# Altium PCB pcb test.PcbDoc
Units mm, origin at the board's own origin, x right, y up, seen from the top; angles counter-clockwise.
Board outline 81.91 x 97.41 mm, 2 copper layers (Top Layer, Bottom Layer); 35 components, 31 nets, 85 pads, 0 vias.
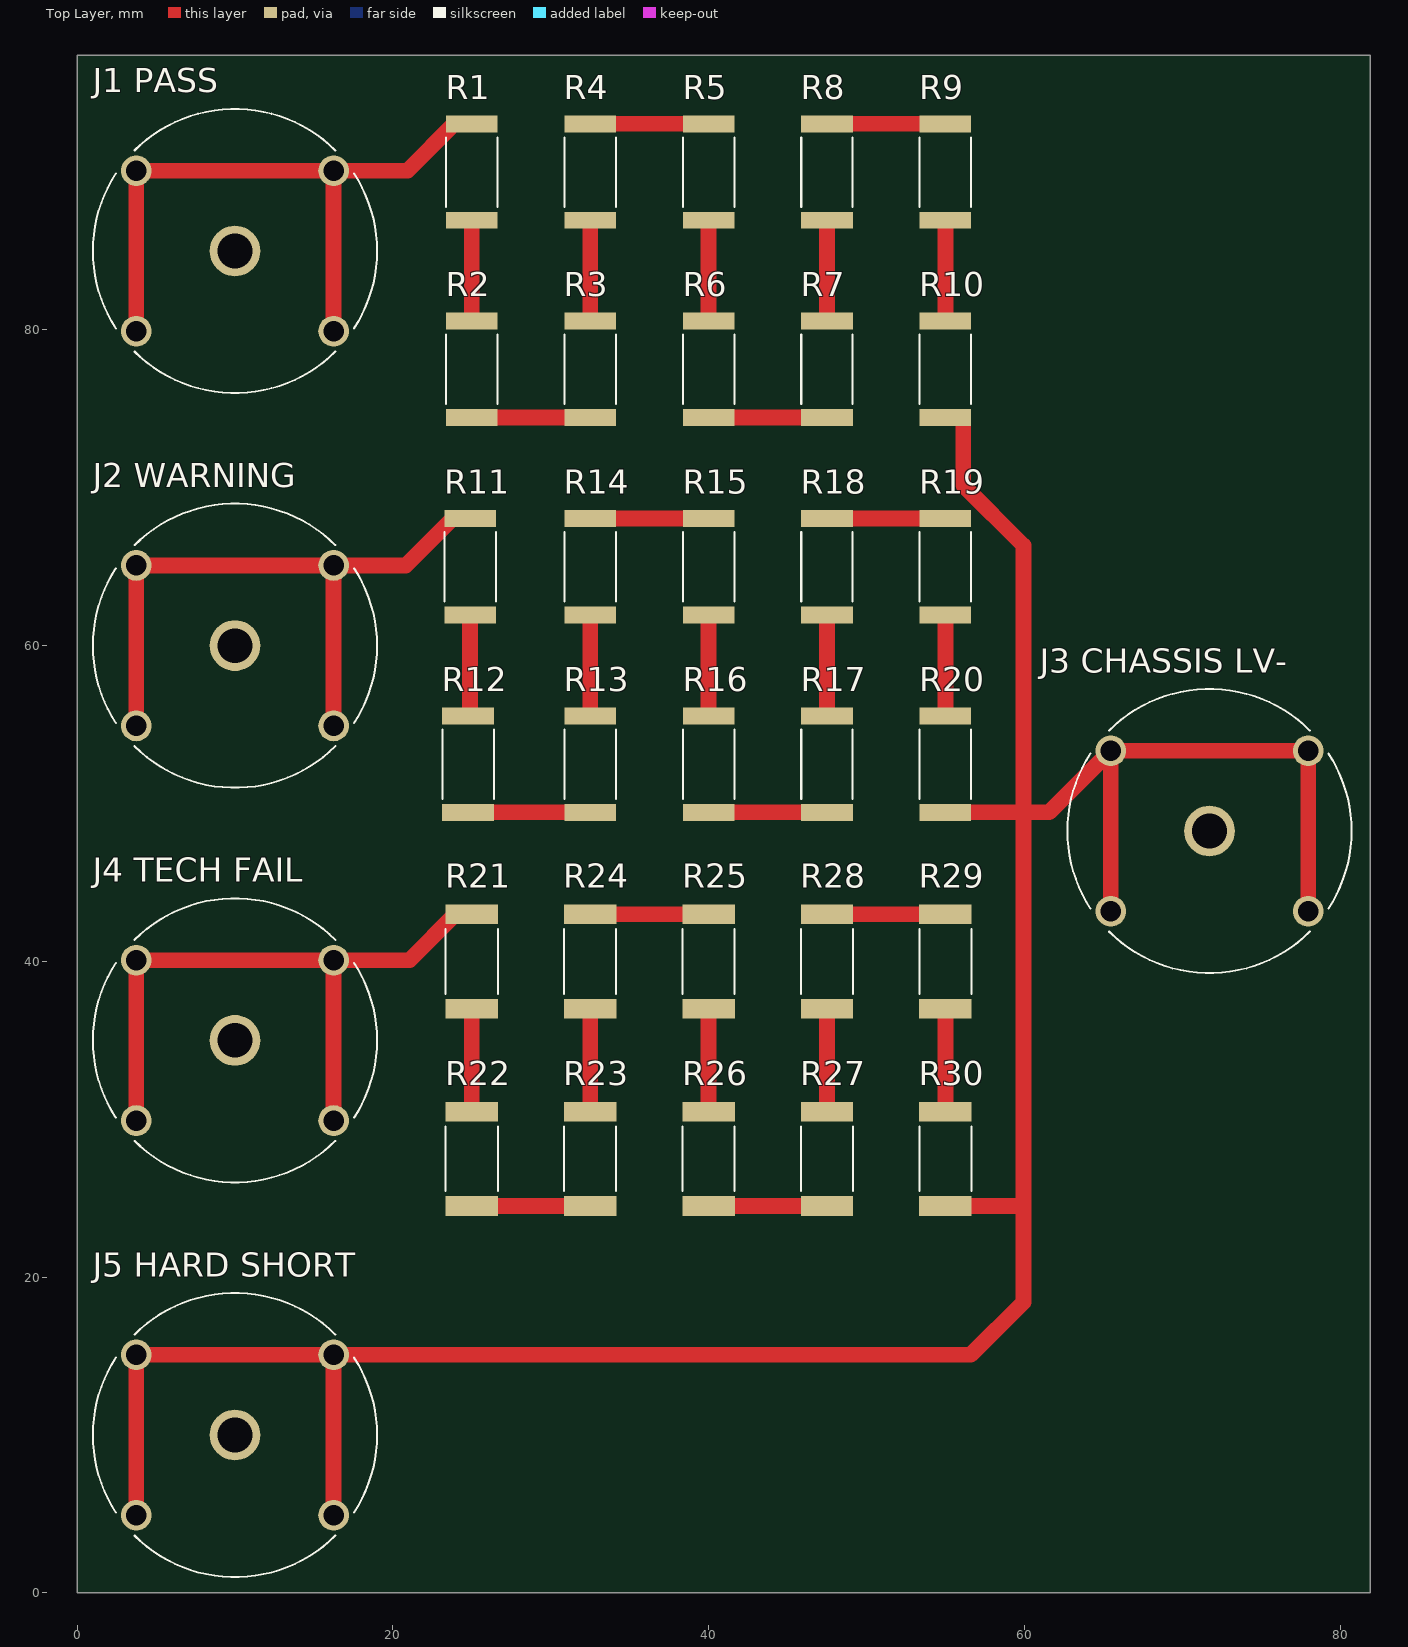
[diagram p0: Top Layer view]
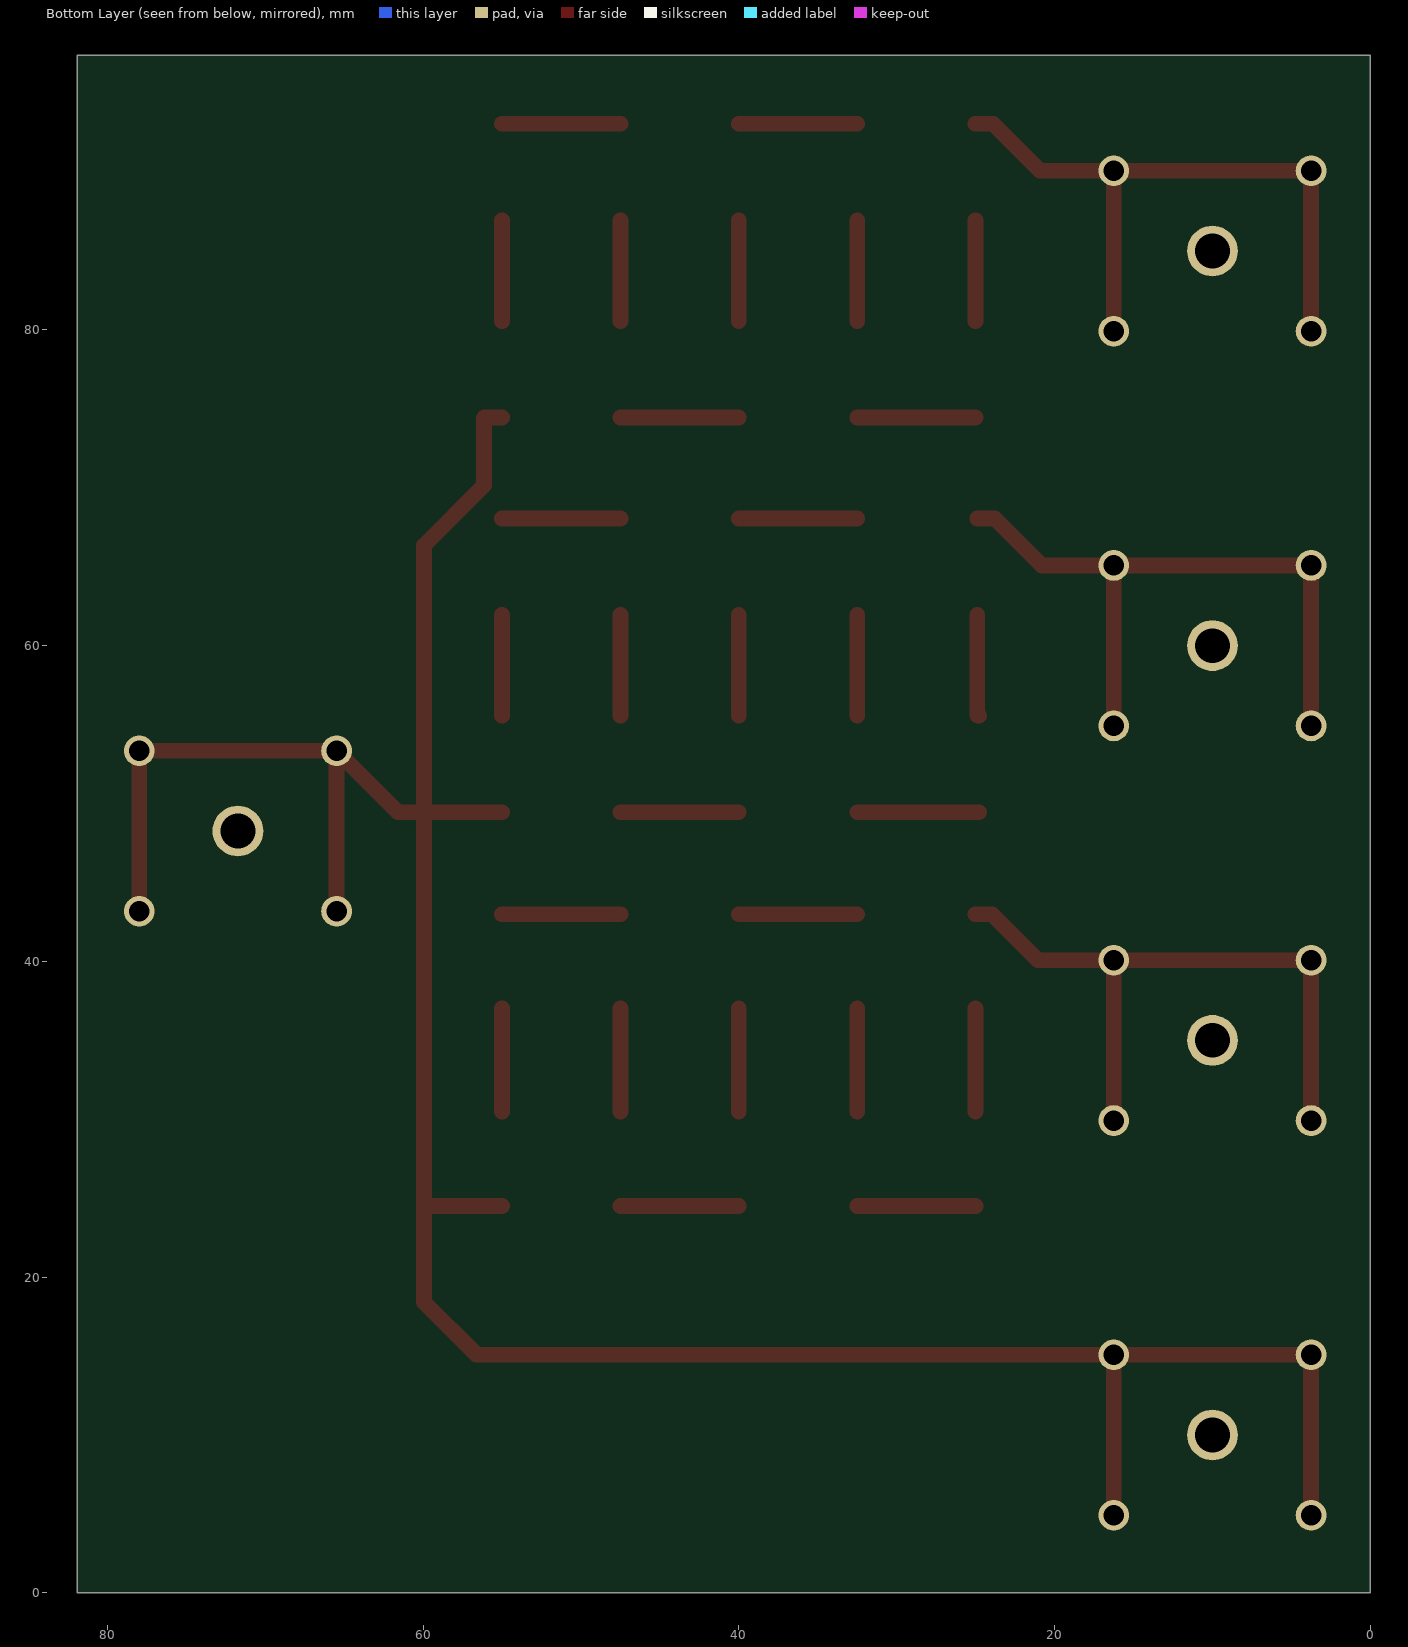
[diagram p1: Bottom Layer view, seen from below]
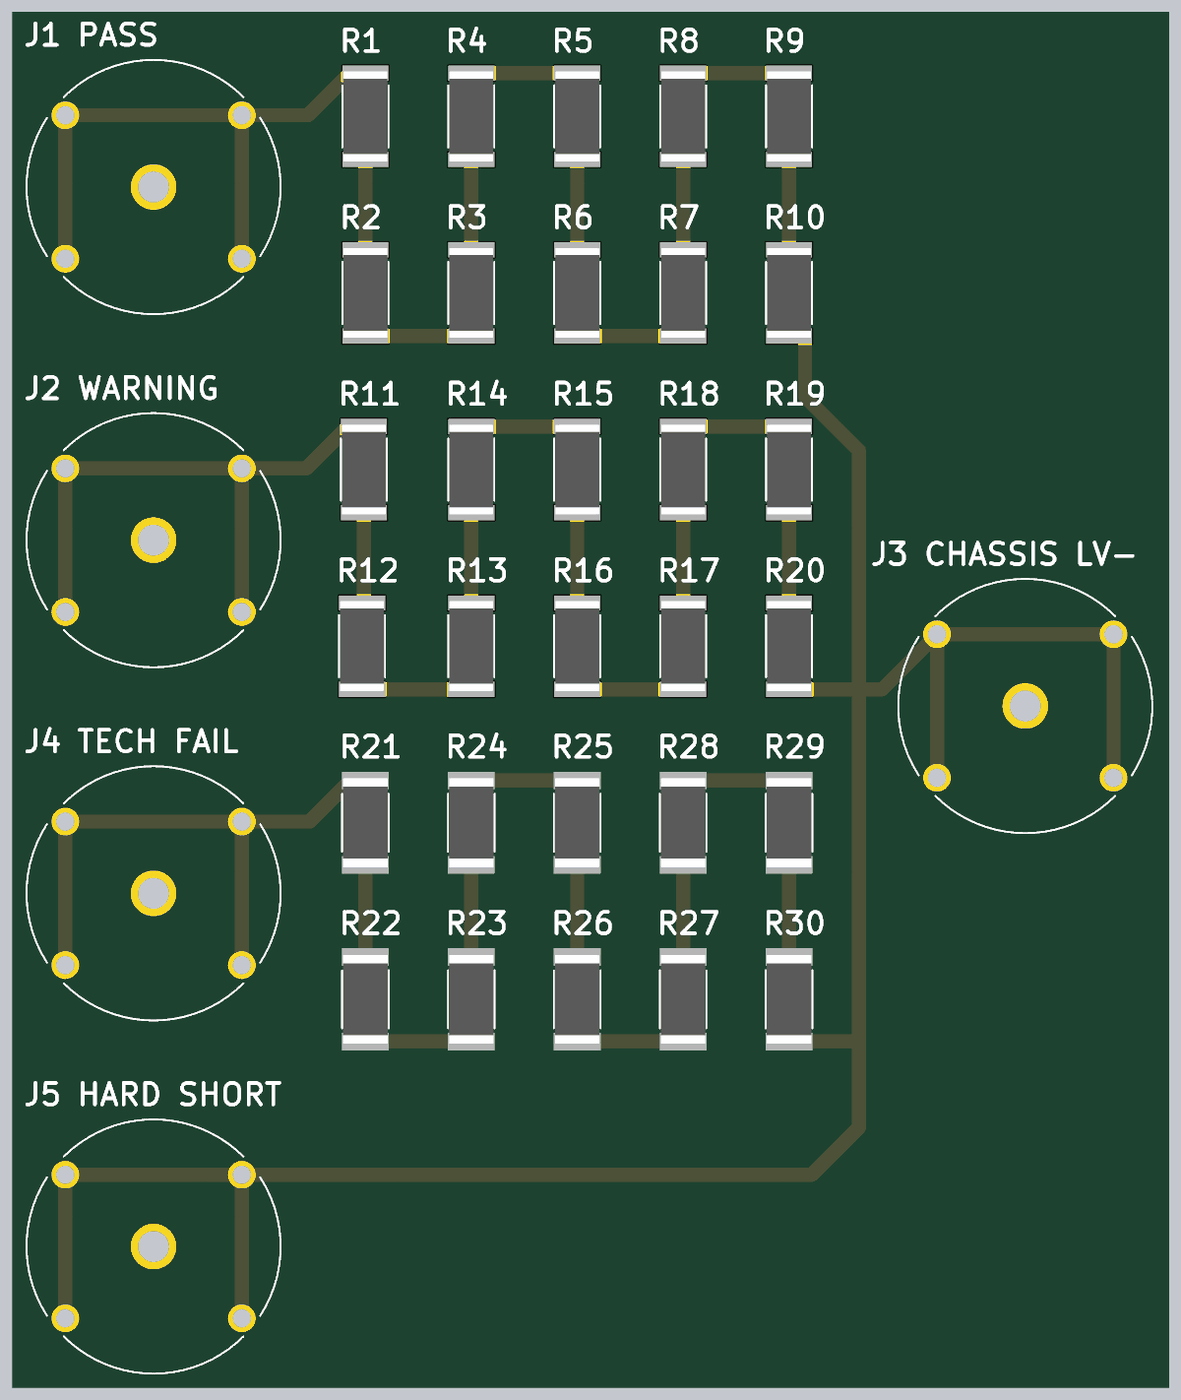
[diagram p2: 3D render of the assembled board from above, using the file's embedded part models]

## Layer stack, top to bottom
Top Solder: solder mask 0.0102, Solder Resist, Dk 3.5
Top Layer: signal copper 0.0356
Dielectric 1: dielectric 0.32, FR-4, Dk 4.8
Bottom Layer: signal copper 0.0356
Bottom Solder: solder mask 0.0102, Solder Resist, Dk 3.5

## Board outline
0,0 0,97.409 81.915,97.409 81.915,0

## Design rules (kind name [scope] priority, off if disabled: settings)
Clearance [All] p1: gap=0.254 ignorepadtopadclearanceinfootprint=FALSE
Height [All] p1: minheight=0 maxheight=30 prefheight=12.7
PolygonConnect [All] p1: connectstyle=Relief reliefconductorwidth=0.254 reliefentries=4 polygonreliefangle="90 Angle" airgapwidth=0.254
RoutingVias [All] p1: holewidth=0.711 width=1.27 viastyle="Through Hole" minholewidth=0.711 minwidth=1.27 maxholewidth=0.711 maxwidth=1.27
SilkToSolderMaskClearance [IsPad] p1: minsilkscreentomaskgap=0.25 clearancetoexposedcopper=TRUE
SolderMaskExpansion [All] p1: expansion=0 istentingtop=FALSE
Width [All] p1: maxlimit=1 minlimit=0.5 preferedwidth=1
28 further rules are at their usual default settings.

## Components (designator, comment, footprint, x,y, rotation, side; value= is the part's Value field where it differs from the comment)
"J1 PASS" "73096-2 (Red)" POMONA_73096-2 10,85 r0 top value="PASS HV INPUT" (schematic designator J1)
"J2 WARNING" "73096-2 (Red)" POMONA_73096-2 10,60 r0 top value="WARNING HV INPUT" (schematic designator J2)
"J3 CHASSIS LV-" "73096-0 (Black)" POMONA_73096-2 71.728,48.26 r0 top value="CHASSIS / LV-" (schematic designator J3)
"J4 TECH FAIL" "73096-2 (Red)" POMONA_73096-2 10,35 r0 top value="TECH FAIL HV INPUT" (schematic designator J4)
"J5 HARD SHORT" "73096-2 (Red)" POMONA_73096-2 10,10 r0 top value="HARD SHORT HV INPUT" (schematic designator J5)
R1 "RC2512FK-0727KL" RESC6331X65N 25,90 r270 top value=27k
R2 "RC2512FK-0727KL" RESC6331X65N 25,77.5 r270 top value=27k
R3 "RC2512FK-0727KL" RESC6331X65N 32.5,77.5 r90 top value=27k
R4 "RC2512FK-0727KL" RESC6331X65N 32.5,90 r90 top value=27k
R5 "RC2512FK-0727KL" RESC6331X65N 40,90 r270 top value=27k
R6 "RC2512FK-0727KL" RESC6331X65N 40,77.5 r270 top value=27k
R7 "RC2512FK-0727KL" RESC6331X65N 47.5,77.5 r90 top value=27k
R8 "RC2512FK-0727KL" RESC6331X65N 47.5,90 r90 top value=27k
R9 "RC2512FK-0727KL" RESC6331X65N 55,90 r270 top value=27k
R10 "RC2512FK-0727KL" RESC6331X65N 55,77.5 r270 top value=27k
R11 "RC2512FK-0747KL" RESC6331X65N 24.892,65 r270 top value=47k
R12 "RC2512FK-0747KL" RESC6331X65N 24.765,52.5 r270 top value=47k
R13 "RC2512FK-0747KL" RESC6331X65N 32.5,52.5 r90 top value=47k
R14 "RC2512FK-0747KL" RESC6331X65N 32.5,65 r90 top value=47k
R15 "RC2512FK-0747KL" RESC6331X65N 40,65 r270 top value=47k
R16 "RC2512FK-0747KL" RESC6331X65N 40,52.5 r270 top value=47k
R17 "RC2512FK-0747KL" RESC6331X65N 47.5,52.5 r90 top value=47k
R18 "RC2512FK-0747KL" RESC6331X65N 47.5,65 r90 top value=47k
R19 "RC2512FK-0747KL" RESC6331X65N 55,65 r270 top value=47k
R20 "RC2512FK-0747KL" RESC6331X65N 55,52.5 r270 top value=47k
R21 "CRCW25126K04FKEG" RESC6331X70N 25,40 r270 top value=6.04k
R22 "CRCW25126K04FKEG" RESC6331X70N 25,27.5 r270 top value=6.04k
R23 "CRCW25126K04FKEG" RESC6331X70N 32.5,27.5 r90 top value=6.04k
R24 "CRCW25126K04FKEG" RESC6331X70N 32.5,40 r90 top value=6.04k
R25 "CRCW25126K04FKEG" RESC6331X70N 40,40 r270 top value=6.04k
R26 "CRCW25126K04FKEG" RESC6331X70N 40,27.5 r270 top value=6.04k
R27 "CRCW25126K04FKEG" RESC6331X70N 47.5,27.5 r90 top value=6.04k
R28 "CRCW25126K04FKEG" RESC6331X70N 47.5,40 r90 top value=6.04k
R29 "CRCW25126K04FKEG" RESC6331X70N 55,40 r270 top value=6.04k
R30 "CRCW25126K04FKEG" RESC6331X70N 55,27.5 r270 top value=6.04k

## Footprints (in the part's own frame and the unit in brackets; to place one, negate y for a bottom-side part, rotate by r counter-clockwise, add the part's x,y. Pads: shape width x height; smd on the part's side, far side on the other; paste and mask are expansions set on the pad)
POMONA_73096-2 [mm]
  round 3.216 hole 2.2: 1(0,0)
  round 1.95 hole 1.3: SH1(-6.25,5.08) SH2(6.25,5.08) SH3(6.25,-5.08) SH4(-6.25,-5.08)
  silkscreen extent -9,-9 9,9
RESC6331X65N [mm]
  rect 1.07x3.27 smd paste+0 mask+0.102: 1(-3.055,0) 2(3.055,0)
  silkscreen extent -2.2,-1.63 2.2,1.63, body extent -3.18,-1.55 3.18,1.55, height 0.65
RESC6331X70N [mm]
  rect 1.24x3.32 smd: 1(-2.99,0) 2(2.99,0)
  silkscreen extent -2.05,-1.65 2.05,1.65, body extent -3.15,-1.58 3.15,1.58, height 0.7

## Part data
"J1 PASS" "J2 WARNING" "J3 CHASSIS LV-" "J4 TECH FAIL" "J5 HARD SHORT": library part 73096-2, Package=None, Availability=Unavailable, MF="{'manufacturer': u'Pomona Electronics'}", MP=73096-2, Price=None
R1 R2 R3 R4 R5 R6 R7 R8 R9 R10: "27 kOhms Â±1% 1W Chip Resistor 2512 (6332 Metric) Moisture Resistant Thick Film", Package="6331 Yageo", Check_prices=https://www.snapeda.com/parts/RC2512FK-0727KL/Yageo/view-part/?ref=eda, MF=Yageo, MP=RC2512FK-0727KL, SnapEDA_Link=https://www.snapeda.com/parts/RC2512FK-0727KL/Yageo/view-part/?ref=snap
R11 R12 R13 R14 R15 R16 R17 R18 R19 R20: "47 kOhms Â±1% 1W Chip Resistor 2512 (6332 Metric) Moisture Resistant Thick Film", Package="6331 Yageo", Check_prices=https://www.snapeda.com/parts/RC2512FK-0747KL/Yageo/view-part/?ref=eda, MF=Yageo, MP=RC2512FK-0747KL, SnapEDA_Link=https://www.snapeda.com/parts/RC2512FK-0747KL/Yageo/view-part/?ref=snap
R21 R22 R23 R24 R25 R26 R27 R28 R29 R30: "6.04 kOhms Â±1% 1W Chip Resistor 2512 (6432 Metric) Automotive AEC-Q200 Thick Film", Package="6331 Vishay", Check_prices=https://www.snapeda.com/parts/CRCW25126K04FKEG/Vishay+Dale/view-part/?ref=eda, MF="Vishay Dale", MP=CRCW25126K04FKEG, SnapEDA_Link=https://www.snapeda.com/parts/CRCW25126K04FKEG/Vishay+Dale/view-part/?ref=snap

## Nets (pads, with @x,y where several pads share a name; then routed paths per layer and width w, separated by ;. In a path a pad name is that pad's centre, name@x,y a point inside that pad or via, vN(x,y) a via of type N, cw(c..) or ccw(c..) an arc to the next point about the centre after c; other vN are vias at no path point)
NetJ1_SH1: "J1 PASS.SH1" "J1 PASS.SH2" "J1 PASS.SH3" "J1 PASS.SH4" R1.1 | length 42.8
  Top Layer w1: 3.75,79.92 3.75,90.08 16.25,90.08 ; 16.25,79.92 16.25,90.08 ; R1.1 23.9,93.055 20.925,90.08 16.25,90.08
NetJ2_SH1: "J2 WARNING.SH1" "J2 WARNING.SH2" "J2 WARNING.SH3" "J2 WARNING.SH4" R11.1 | length 42.7
  Top Layer w1: 3.75,54.92 3.75,65.08 16.25,65.08 ; 16.25,54.92 16.25,65.08 ; R11.1 23.792,68.055 20.817,65.08 16.25,65.08
NetJ3_SH1: "J3 CHASSIS LV-.SH1" "J3 CHASSIS LV-.SH2" "J3 CHASSIS LV-.SH3" "J3 CHASSIS LV-.SH4" "J5 HARD SHORT.SH1" "J5 HARD SHORT.SH2" "J5 HARD SHORT.SH3" "J5 HARD SHORT.SH4" R10.2 R20.2 R30.2 | length 187
  Top Layer w1: 3.75,4.92 3.75,15.08 15.811,15.08 16.002,14.889 16.002,14.859 16.223,15.08 16.25,15.08 ; 16.25,4.92 16.25,15.08 ; R30.2 59.816,24.51 59.944,24.638 ; R20.2 59.775,49.445 ; R10.2 56.1,74.445 56.135,74.41 56.135,70.156 59.944,66.347 59.944,49.276 ; 65.478,43.18 65.478,53.34 ; 77.978,43.18 77.978,53.34 65.478,53.34 ; 16.25,15.08 56.609,15.08 59.944,18.415 59.944,24.638 ; 59.775,49.445 61.583,49.445 65.478,53.34 ; 59.775,49.445 59.944,49.276 ; 59.944,24.638 59.944,49.276
NetJ4_SH1: "J4 TECH FAIL.SH1" "J4 TECH FAIL.SH2" "J4 TECH FAIL.SH3" "J4 TECH FAIL.SH4" R21.1 | length 42.8
  Top Layer w1: 3.75,29.92 3.75,40.08 16.25,40.08 ; 16.25,29.92 16.25,40.08 ; R21.1 23.96,42.99 21.05,40.08 16.25,40.08
NetR1_2: R1.2 R2.1 | length 6.4
  Top Layer w1: R2.1 R1.2
NetR2_2: R2.2 R3.1 | length 7.5
  Top Layer w1: R2.2 R3.1
NetR3_2: R3.2 R4.1 | length 6.4
  Top Layer w1: R3.2 R4.1
NetR4_2: R4.2 R5.1 | length 7.5
  Top Layer w1: R4.2 R5.1
NetR5_2: R5.2 R6.1 | length 6.4
  Top Layer w1: R6.1 R5.2
NetR6_2: R6.2 R7.1 | length 7.5
  Top Layer w1: R6.2 R7.1
NetR7_2: R7.2 R8.1 | length 6.4
  Top Layer w1: R7.2 R8.1
NetR8_2: R8.2 R9.1 | length 7.5
  Top Layer w1: R8.2 R9.1
NetR9_2: R9.2 R10.1 | length 6.4
  Top Layer w1: R10.1 R9.2
NetR11_2: R11.2 R12.1 | length 6.5
  Top Layer w1: R12.1 24.857,55.555 24.892,55.59 R11.2
NetR12_2: R12.2 R13.1 | length 7.7
  Top Layer w1: R12.2 R13.1
NetR13_2: R13.2 R14.1 | length 6.4
  Top Layer w1: R13.2 R14.1
NetR14_2: R14.2 R15.1 | length 7.5
  Top Layer w1: R14.2 R15.1
NetR15_2: R15.2 R16.1 | length 6.4
  Top Layer w1: R16.1 R15.2
NetR16_2: R16.2 R17.1 | length 7.5
  Top Layer w1: R16.2 R17.1
NetR17_2: R17.2 R18.1 | length 6.4
  Top Layer w1: R17.2 R18.1
NetR18_2: R18.2 R19.1 | length 7.5
  Top Layer w1: R18.2 R19.1
NetR19_2: R19.2 R20.1 | length 6.4
  Top Layer w1: R20.1 R19.2
NetR21_2: R21.2 R22.1 | length 6.5
  Top Layer w1: R22.1 R21.2
NetR22_2: R22.2 R23.1 | length 7.5
  Top Layer w1: R22.2 R23.1
NetR23_2: R23.2 R24.1 | length 6.5
  Top Layer w1: R23.2 R24.1
NetR24_2: R24.2 R25.1 | length 7.5
  Top Layer w1: R24.2 R25.1
NetR25_2: R25.2 R26.1 | length 6.5
  Top Layer w1: R26.1 R25.2
NetR26_2: R26.2 R27.1 | length 7.5
  Top Layer w1: R26.2 R27.1
NetR27_2: R27.2 R28.1 | length 6.5
  Top Layer w1: R27.2 R28.1
NetR28_2: R28.2 R29.1 | length 7.5
  Top Layer w1: R28.2 R29.1
NetR29_2: R29.2 R30.1 | length 6.5
  Top Layer w1: R30.1 R29.2
pads on no net: "J1 PASS.1" "J2 WARNING.1" "J3 CHASSIS LV-.1" "J4 TECH FAIL.1" "J5 HARD SHORT.1"